# Altium PCB ECG_Final.PcbDoc (part 3 of 3)
Units mil, origin at the board's own origin, x right, y up, seen from the top; angles counter-clockwise.
Board outline 2555.63 x 1380.57 mil, 4 copper layers (Top Layer, Layer 1, Layer 2, Bottom Layer), stack 61.583 mil thick; 110 components, 95 nets, 402 pads, 94 vias.
Unrouted connection lines stored in the file: 82.
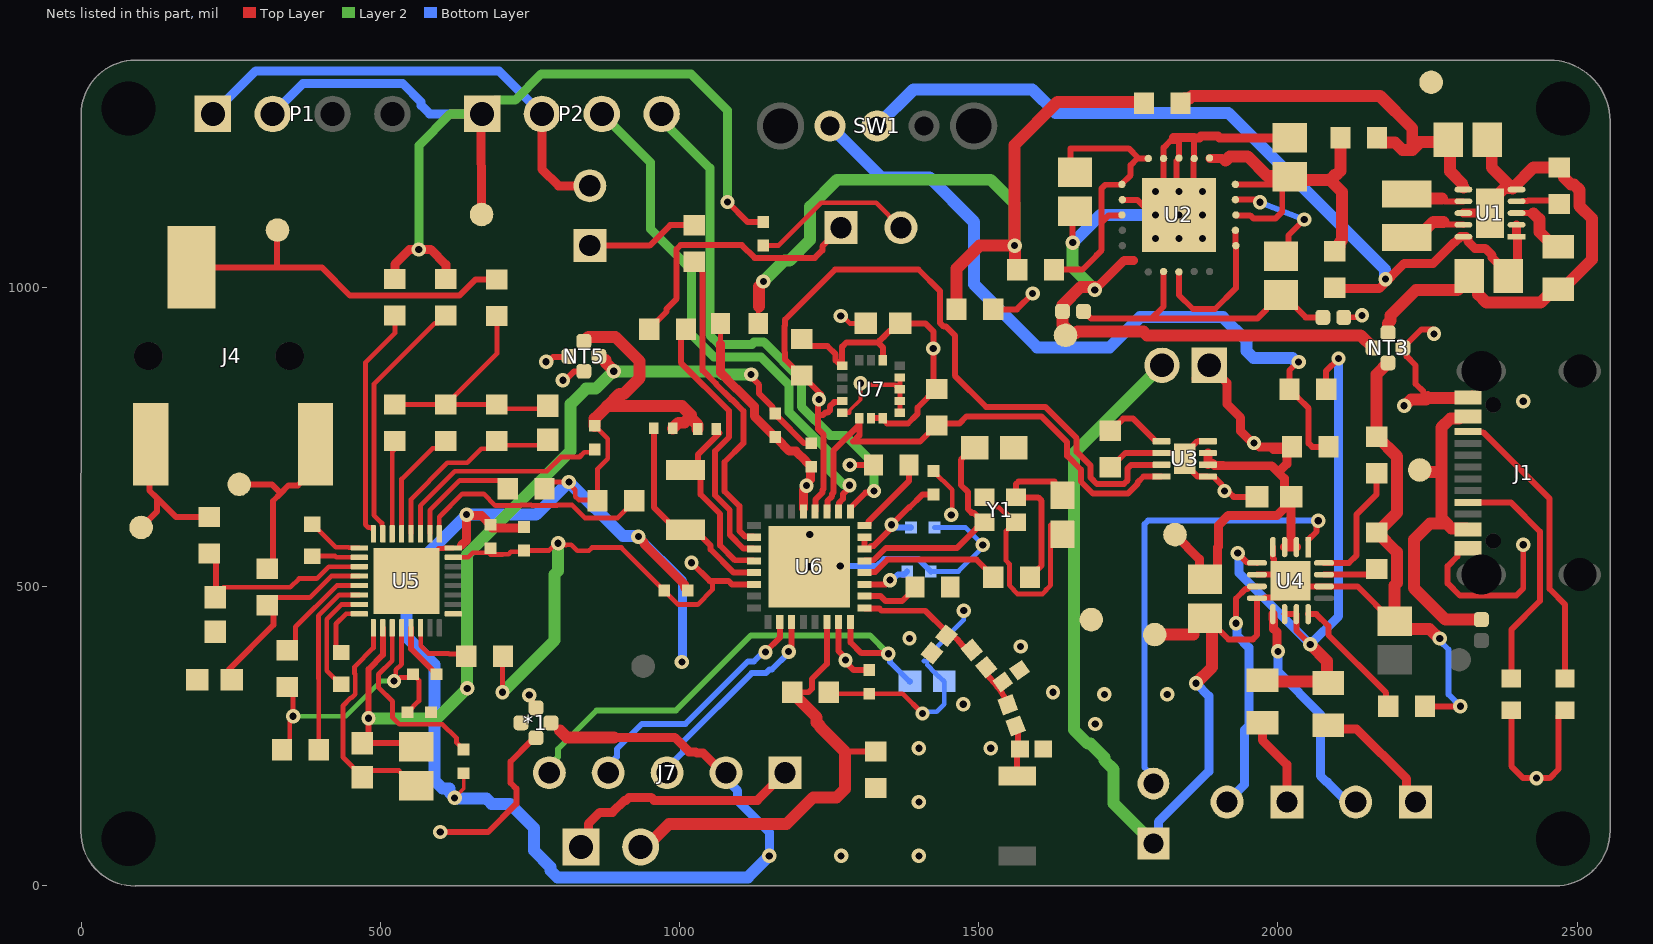
[diagram p4: the nets of this part, all layers, seen from the top]

## Via types
v1: diameter 24, hole 12, Top Layer to Bottom Layer, 84 vias
v2: diameter 23.62, hole 11.81, Top Layer to Bottom Layer, 9 vias
v3: diameter 24/24/24/24 (per signal layer), hole 12, Top Layer to Bottom Layer, 1 vias

## Nets (pads, with @x,y where several pads share a name; then routed paths per layer and width w, separated by ;. In a path a pad name is that pad's centre, name@x,y a point inside that pad or via, vN(x,y) a via of type N, cw(c..) or ccw(c..) an arc to the next point about the centre after c; other vN are vias at no path point) (continued)
AGND: *1.1 C10.2 C11.1 C16.1 C17.1 C20.2 C21.2 C34.2 C35.2 NT5.1 U5.10 U5.13 | length 1640.6
  Top Layer w10: v1(480,280) 480,248.61 C20.2@470,238.61 553.9,238.61 C21.2@560,232.51 ; v1@480.19,280 480.19,362.19 503.96,385.96 U5.10@503.96,431.21 ; U5.13@551.2,431.21 551.2,396.17 C10.2@593.82,353.55 ; v1(1119.61,854.5) 1119.61,850.71 1133,837.32 1133,822.63 1155.16,800.48 1155.16,794.21 1164.84,784.53 1164.84,782.84 1208,739.68 C34.2@1220,739.68
  Top Layer w20: NT5.1@876,879 876,875.08 890,861.08 v1(890,860)
  Layer 2 w20: v1(480,280) 595,280 v1(645,330) ; v1@645,331.08 645,554 818,727 818,805 843.95,830.95 859.87,830.95 888.92,860 v1(890,860) 890.75,859.25 1067.61,859.25 1072.36,854.5 v1(1119.61,854.5)
AVDD: C10.1 C11.2 R37.1 R38.1 U5.12 | length 515.6
  Top Layer w8: R38.1@335.7,227.58 348.6,240.49 348.6,273.69 354.13,279.22 v1(354.13,283.55) 354.13,322.39 R37.1@344.13,332.39 ; U5.12@535.45,431.21 535.45,370.65 525.77,360.98 525.77,345.47 v1(522.71,342.41) 527.04,342.41 532.61,347.98 548.87,347.98 C10.1@554.45,353.55 564.45,343.55 564.45,309.13 C11.2@545.32,290
  Layer 2 w8: v1(354.13,283.55) 442.44,283.55 501.3,342.41 v1(522.71,342.41)
BGND: C6.1 C8.1 J2.2 NT3.1 pad.3@1794,420 R11.1 R14.1 R15.1 R16.1 U4.4 U4.6 U4.8 U4.14 U4.17 | length 2723.9
  Top Layer w10: C8.1@1878,447.49 1881.97,447.49 1917.46,412 1958.14,412 1965,418.86 U4.8@1965,480.63 ; U4.6@1965,520 2001.71,520 1993.05,538.14 1993.05,546.19 1991.5,547.74 U4.4@1991.5,566.18 ; U4.8@1977.05,480.92 1978.31,482.18 2003.95,482.18 2004.05,482.09 2019.04,493.83 U4.17@2019.76,499.7 ; U4.17@2021.03,510.16 2030.87,500.31 U4.14@2077.05,500.31 2133.23,500.31 2191.03,442.51 C6.1@2195,442.51 ; R11.1@2245.58,300 v1(2305,300)
  Top Layer w20: pad.3@1794,420 1858.54,420 1859.33,420.79 1859.33,432.79 1874.03,447.49 C8.1@1878,447.49 1890,435.49 1890,365.29 v1(1863.14,338.43) ; R14.1@2165,590.58 R14.1@2166.05,590.58 ; R15.1@2165,750.58 2165,855 NT3.1@2184.01,874.01 ; R15.1@2166.05,750.58 2199.02,717.61 2199.02,623.55 R14.1@2166.05,590.58 ; v1(2270.47,413.32) 2269.39,413.32 2253.67,429.05 2208.46,429.05 C6.1@2195,442.51 2195,502.07 2198.86,505.93 2198.86,557.77 R14.1@2166.05,590.58
  Layer 2 w20: R16.1@1792,71 1725.42,137.58 1725.42,194.44 1710,209.87 1710,214.44 1686.78,237.65 1682.22,237.65 1659,260.87 1659,722.74 J2.2@1806.26,870
  Bottom Layer w10: v1(2270.47,413.32) 2270.47,409.53 2285,395.01 2285,320 v1(2305,300)
  Bottom Layer w15: R16.1@1792,71 1800.08,79.08 1800.08,106.72 1884.57,191.21 1884.57,317 v1(1863.14,338.43)
BOOT0: J5.2 R30.1 R32.2 U6.22 | length 789.3
  Top Layer w10: R30.1@1188.14,323.53 1215.54,323.53 1221.39,329.39 1221.39,346.04 1246.19,370.84 U6.22@1246.19,440.87 ; 1276.84,223.7 1277.59,224.45 R32.2@1328.23,224.45
  Top Layer w20: J5.2@935,65 944.03,65 982.58,103.55 1179.03,103.55 1223.4,147.91 1262.59,147.91 1276.84,162.16 1276.84,223.7 1234.6,265.93 1234.6,267.49 1229.06,273.03 1229.06,281.56 1188.14,322.48 R30.1@1188.14,323.53
DGND: *1.3 C12.2 C13.1 C18.1 C19.1 C22.2 C23.1 C24.2 C25.1 C26.2 C27.2 C28.2 C29.2 C30.2 C31.2 C32.2 C33.2 C36.1 C37.1 C38.1 C39.1 C40.1 DS3.2 DS4.2 J7.2 NT5.4 P1.1 P2.2 pad.3@1688,445 pad.3@2256,1343 R25.1 R27.1 R30.2 R32.1 U5.24 U5.33 U6.33 U7.5 U7.9 U7.10 U7.11 U7.12 Y1.2 Y1.4 | length 6027.5
  Top Layer w6: v1(624,147) 639,162 C18.1@639,188.31 ; 1283.43,790.63 1284.43,791.63 1284.43,794.63 1302.43,812.63 v1(1302.43,839.84)
  Top Layer w8: U5.33@543.33,509.75 597.3,563.73 606.28,563.73 607.09,564.54 621.54,564.54 U5.24@621.87,564.87 ; R25.1@774.13,663.55 785.58,675 v1(815,675) 815,672.36 825.79,661.57 825.79,650.56 831.44,644.91 861.59,644.91 R27.1@862.94,643.55 ; *1.3@785,272.5 787.41,272.5 800,259.91 ; C19.1@858.06,768.77 880,746.82 880,713.78 862.98,696.76 R27.1@862.98,643.59 ; C29.2@1140,1070.32 1165.4,1070.32 1236.64,1141.56 1328.44,1141.56 DS3.2@1370,1100 ; R30.2@1249.3,323.53 1251.68,321.15 1372.85,321.15 v1(1406,288) ; v1(1269.5,952.43) 1272.21,952.43 1284.64,940 C40.1@1311.39,940 ; U7.5@1271.77,790.63 1283.43,790.63 ; v1(1302.43,839.84) 1304.83,837.45 1361.1,837.45 1361.1,835.16 1366.26,830 U7.11@1368.23,830 U7.10@1368.23,810.32 U7.9@1368.23,790.63 ; U7.11@1365.34,830 1368.23,832.89 U7.12@1368.23,849.68 ; C27.2@1424.13,693.24 1455.78,661.59 1455.78,621.78 v1(1454,620) ; Y1.4@1509.36,649.18 1511.33,649.18 1527.9,632.61 1533.45,632.61 1541.64,624.42 1543.97,624.42 Y1.2@1560.54,607.84 ; Y1.2@1562.51,607.84 Y1.2@1560.54,607.84 ; C38.1@1640,587.45 1624.28,603.18 1620,603.18 1620,502.69 1612.43,495.12 1612.43,493.71 1606.57,487.85 1564.48,487.85 1558.62,493.71 1558.62,495.12 1551.27,502.47 1551.27,537.9 1545.73,543.44 1545.73,593.03 Y1.2@1560.54,607.84
  Top Layer w10: v1(1284.67,703.34) 1323.92,703.34 C32.2@1324.13,703.55
  Top Layer w15: 635.35,569.2 644.13,577.98 v1(644.13,620.37) 645.86,618.65 669.11,618.65 C13.1@686.48,601.28 ; C13.1@686.48,598.43 738.74,598.43 C12.2@740,599.68 ; P2.2@770,1290 770,1197.69 797.69,1170 DS4.2@850,1170 ; 890,248.2 991.81,248.2 1016.09,223.92 1026.7,223.92 1028.89,221.72 1039.5,221.72 1072.22,189 J7.2@1077.57,189 ; v1(931.11,583.65) 931.11,582.81 941.64,572.28 941.64,570.06 1007.98,503.72 1007.98,499.39 C28.2@1013.82,493.55
  Top Layer w20: 800,259.91 811.72,248.2 890,248.2 ; NT5.4@840,910 847.5,917.5 892.5,917.5 933.26,876.74 933.26,848.66 906.6,822 899.28,822 878.92,801.64 ; C19.1@858.06,768.77 858.06,780.77 878.92,801.64 ; C36.1@988.57,764.68 997.82,773.94 1007.82,773.94 1018.74,784.86 1018.74,786.87 1003.97,801.64 878.92,801.64 ; 1019.05,781.23 1030.06,770.22 C37.1@1030.06,763.55
  Bottom Layer w8: v1(1406,288) 1409.06,291.06 1429.68,291.06 1442.37,303.75 C25.1@1442.37,341.59 1427.5,355.54 1413.83,369.21 ; 1408.68,375.89 ccw(c1411.38,380.97) 1416.36,378.1 1417.13,379.43 1417.13,386.54 1475,444.42 v1(1475,460) ; C31.2@1419.75,525.42 1466.01,525.42 1503.39,562.81 1503.39,564.3 v1@1502.33,565.36 ; C33.2@1426.22,598.75 1477.9,598.75 1502.33,574.32 v1@1502.33,565.36 ; v1(1506.81,569.84) v1@1502.33,565.36
  Bottom Layer w10: U6.33@1268.65,534.39 1329.74,534.39 1341.61,546.27 1398.91,546.27 C31.2@1419.75,525.42
  Bottom Layer w15: P1.1@220,1290 292,1362 698,1362 P2.2@770,1290 ; v1(931.11,583.65) 1005.25,509.52 1005.25,375.47 v1(1003.78,374) ; J7.2@1077.57,189 1077.57,178.14 1097.13,158.59 1097.13,142.15 1150,89.28 v1(1150,50)
  Bottom Layer w20: v1(931.11,583.65) 930.35,584.42 905.58,584.42 v1(815,675) 760.37,620.37 v1(644.13,620.37) 543.33,519.56 543.33,416.67 590,370 590,176.54 604.14,162.4 615.52,162.4 615.52,156.56 624,148.08 v1(624,147) 625,146 677,146 686,137 716.25,137 756.86,96.39 756.86,58.7 784.09,31.47 784.09,25.81 795.81,14.09 1114.09,14.09 v1(1150,50)
  other v1: 1270,50 1400,50 1400,140 1400,230 1520,230 1694.62,270.5 1474.13,303.55 1710,320 1815,320 1624.13,323.55 1570,400 1384.13,413.55
DGNG: C5.1 NT2.1 NT4.1 U2.7 | length 526.3
  Top Layer w10: NT2.1@1675,960 1675.68,960 1687.71,947.97 1788.57,947.97 ; U2.7@1808.9,1026.69 1808.9,968.3 1788.57,947.97 ; NT4.1@2075,950 2046.46,950 2008.97,987.49 C5.1@2005,987.49 2001.03,987.49 1981.33,967.79 1981.33,963.82 1965.48,947.97 1788.57,947.97
DVDD: C12.1 C13.2 C26.1 C27.1 C28.1 C29.1 C31.1 C33.1 C40.2 J5.1 J7.1 P1.2 P2.1 pad.3@669,1122 R22.1 R26.2 R28.2 R33.1 R34.1 R35.1 U5.23 U6.14 U6.23 U6.27 U6.30 U6.31 U7.1 U7.7 U7.8 U7.14 | length 4152.3
  Top Layer w8: U5.23@621.87,549.12 646.57,549.12 654.27,556.82 683.15,556.82 C13.2@684.13,557.8 ; 684.13,553.87 703.84,553.87 ; 703.84,554.29 714.16,554.29 718.16,558.29 737.97,558.29 C12.1@740,560.32 781.52,560.32 793.7,572.5 v1(796.91,572.5) 799.97,569.43 809.61,569.43 809.94,569.11 810.83,570 818.86,570 828.86,560 848.39,560 853.67,565.28 902.72,565.28 C28.1@974.45,493.55 998,470 1030.12,470 1054.82,494.7 1054.82,505.18 1050.39,509.61 ; v1(704.13,323.55) 704.13,382.97 R22.1@704.71,383.55
  Top Layer w10: v1(1020,540) 1050.39,509.61 1081.75,509.61 1087.49,503.87 U6.14@1124.13,503.87 ; v1(1080,1143) 1113.32,1109.68 C29.1@1140,1109.68 ; R34.1@1204.13,914.13 1216.04,902.23 1246.95,902.23 1260.84,888.33 1260.84,878.33 1269.8,869.37 U7.1@1271.77,869.37 1271.77,901.26 1278.6,908.09 1331.45,908.09 ; U6.23@1265.88,440.87 1265.88,392.25 1277.17,380.96 v1(1277.17,377.17) ; v1@1280,380 1282.68,377.32 1282.68,368.88 1291.04,360.52 C26.1@1316.87,360.52 ; U6.27@1309.17,503.87 1344.6,503.87 v1(1351.73,511) ; U6.30@1309.17,562.92 1310.08,563.83 1315.99,563.83 1320.36,568.2 1324.51,568.2 1351.46,595.15 1351.46,600.87 v1(1354.13,603.55) 1384.15,633.57 1384.15,632.23 1405.79,653.87 C27.1@1424.13,653.87 ; U6.30@1309.17,563.16 U6.31@1309.17,582.61 ; U7.7@1320,781.77 U7.8@1339.68,781.77 1339.68,779.8 1346.75,772.74 1381.64,772.74 1395.26,786.36 1397.62,788.72 1397.62,799.25 R35.1@1428.95,830.58 ; 1337.89,901.64 1331.45,908.09 ; U7.14@1339.68,878.23 1339.68,899.52 ; C40.2@1355.77,932.41 1355.77,928.08 1354.74,927.04 1350.4,927.04 1341.26,917.9 1341.26,917.49 1334.82,911.04 1334.4,911.04 1331.45,908.09 ; C40.2@1368.61,940 1410.59,940 1424,926.59 1424,835.53 R35.1@1428.95,830.58 ; R35.1@1430,830.58 R35.1@1428.95,830.58 ; R33.1@1524.13,963.55 1563.55,963.55 v1(1590,990)
  Top Layer w15: R26.2@524.13,1014.37 524.13,1038.8 548.47,1063.14 563.72,1063.14 v1(564.13,1063.55) 584.13,1063.55 609.42,1038.27 R28.2@609.42,1014.37 ; pad.3@669,1122 668,1288 P2.1@670,1290 ; J5.1@835,65 847.42,77.42 847.42,103.55 866.59,122.72 887.86,122.72 908.13,143 910.78,143 915.74,147.96 952.53,147.96 957.49,143 1130,143 J7.1@1176,189
  Layer 2 w15: v1(564.13,1063.55) 564.13,1237.15 616.99,1290 P2.1@670,1290 693.01,1313.01 725.11,1313.01 769.1,1357 1019,1357 1080,1296 v1(1080,1143)
  Layer 2 w20: v1(704.13,323.55) 791.05,410.46 791.05,520.49 796.91,526.36 v1(796.91,572.5)
  Bottom Layer w10: v1(1351.73,511) 1355.52,511 1365.1,520.58 1375.54,520.58 C31.1@1380.38,525.42 ; v1(1354.13,603.55) 1357.92,603.55 1362.72,598.75 C33.1@1386.85,598.75
  Bottom Layer w15: P1.2@320,1290 371,1341 536.9,1341 568.01,1309.89 568.01,1304.23 582.24,1290 P2.1@670,1290
  other v1: 1424,898
GBUCK: C1.1 C2.1 NT3.3 R5.1 R6.1 U1.5 U1.8 U1.11 | length 935.2
  Top Layer w15: U1.8@2310,1124.37 U1.11@2354.41,1124.37 ; U1.11@2375.84,1163.51 U1.5@2394.03,1163.51
  Top Layer w20: NT3.3@2184.01,924.01 2184.01,940.04 2188.5,944.53 2188.5,953.5 2230.67,995.67 2300.28,995.67 2319.98,1015.36 C1.1@2319.98,1019.33 2334.68,1004.64 2334.68,988.55 2348.56,974.67 2438.83,974.67 2461.52,997.36 2475.3,997.36 2525.06,1047.12 2525.06,1114.94 2503.96,1136.04 2503.96,1162.95 2494.58,1172.32 2489.67,1172.32 2477.96,1184.04 2477.96,1193.68 R6.1@2471.05,1200.58 ; C2.1@2350,1247.12 2357.38,1239.74 2357.38,1200.17 U1.5@2391.89,1165.66 ; U1.11@2354.41,1124.37 2354.41,1142.09 U1.11@2375.84,1163.51 ; U1.5@2394.03,1167.8 2426.81,1200.58 R6.1@2471.05,1200.58 ; R6.1@2470,1200.58 R6.1@2471.05,1200.58
GND: *1.2 *1.4 C7.1 J1.A1-B12 J1.B1-A12 NT3.4 NT4.2 NT5.2 NT5.3 R3.1 R7.1 R13.2 U3.1 U3.4 U3.6 U3.9 | length 1619
  Top Layer w10: v1(600,90) 680,90 727.13,137.13 727.13,162.33 717.44,172.03 717.44,207.44 *1.4@751.5,241.5 ; v1@744.96,318.74 v1(748.75,318.74) 748.75,314.95 753.27,310.43 753.27,306.73 *1.2@756.5,303.5 ; v1(777,876) 780.79,876 788.33,883.54 807.6,883.54 809.05,885 NT5.3@815,885 ; v1(805,845) 808.79,845 823.79,860 NT5.2@840,860 ; R13.2@1720,699.42 1721.05,699.42 1745.03,723.39 U3.6@1805.36,723.39 1834.29,723.39 U3.9@1844.13,713.55 ; 1865.47,742.76 1844.13,721.43 U3.9@1844.13,713.55 ; 1866.92,743.08 U3.4@1882.91,743.08 ; C7.1@1965,650 1925.86,650 1920,655.86 1920,656.58 1892.88,683.71 1883.23,683.71 1882.6,684.34 1865.47,684.34 1844.13,705.68 U3.9@1844.13,713.55 ; NT4.2@2110,950 2110.28,950.28 2137.35,950.28 v1(2140.42,953.35) ; NT3.4@2209.01,899.01 2240,930 2260,930 2260,923.37 v1(2260.92,922.45) ; v1(2210.92,802.45) v1@2211.65,801.72 ; 2215.01,885.44 2215.01,884.99 2230,870 2230,839.03 2243.45,825.58 2243.45,823.08 2247.89,818.64 ; 2251.02,821.77 2257.28,815.51 ; J1.A1-B12@2317.36,564.09 2306.54,564.09 2299.72,557.28 2299.72,550.43 2283.66,534.37 2283.66,505.63 2303.98,485.31 2398.31,485.31 2410,497 v1(2410,570) ; J1.B1-A12@2317.36,816.06 J1.B1-A12@2324.17,822.87 ; R3.1@2390,293.41 2390,200 2410,180 2454.14,180 2469.01,194.87 2469.01,283.54 2478.89,293.41 R7.1@2480,293.41 ; v1@2407.12,810 v1(2410,810)
  Top Layer w20: v1@2211.65,801.72 2211.65,802.1 2222.7,813.15 2247.26,813.15 2249.62,815.51 2316.81,815.51 J1.B1-A12@2317.36,816.06
  other v1: 2432.07,180 1910.82,659.86
IN1N: J4.1 pad.3@100,599 R23.1 | length 256.1
  Top Layer w10: pad.3@100,599 126.83,625.83 126.83,647.83 ; J4.1@115.96,737.91 114.13,736.09 114.13,660.52 126.83,647.83 ; R23.1@213.94,616.66 158,616.66 126.83,647.83
IN1P: J4.3 pad.3@264,671 R24.1 | length 326
  Top Layer w10: pad.3@264,671 318.43,671 333.31,656.12 ; R24.1@310.96,530.06 320.41,539.51 320.41,643.23 333.31,656.12 ; J4.3@391.55,737.91 391.55,698.54 362.02,669.02 346.2,669.02 333.31,656.12
NetA1_1: 
NetC1_2: C1.2 R4.2 SW1.2 U1.1 U1.2 U1.10 | length 1473.1
  Top Layer w15: R4.2@2095,999.42 2096.45,997.97 2168.96,997.97 2211.14,1040.16 2259.59,1040.16 2295.04,1075.6 2295.95,1075.6 2305.34,1085 U1.10@2314.56,1085 ; U1.10@2310,1085 U1.10@2314.56,1085 ; U1.2@2398.82,1104.69 U1.1@2398.82,1085 2400.23,1083.6 2400.23,1034.56 C1.2@2385,1019.33 2385,1023.3 2358.18,1050.13 2358.18,1053.59 2346.25,1065.51 2329.21,1065.51 2317.29,1077.44 2317.29,1082.27 U1.10@2314.56,1085
  Bottom Layer w20: SW1.2@1330,1270 1391,1331 1589.4,1331 1628.4,1292 1917,1292 2179.08,1029.92 2179.08,1014.83 v3(2179.85,1014.07)
NetC2_2: C2.2 R1.1 R2.1 U1.6 | length 679
  Top Layer w20: R1.1@1837.38,1307.96 1837.38,1309.01 1844.28,1315.91 1851.91,1315.91 1856,1320 2170.6,1320 2224.47,1266.12 2224.47,1230.53 2225,1230 ; R2.1@2165.58,1250 2165.58,1248.95 2172.48,1242.04 2195.98,1242.04 2208.55,1229.47 2224.47,1229.47 2225,1230 ; C2.2@2284.98,1247.12 2284.98,1245.49 C2.2@2287.51,1242.96 ; U1.6@2310,1166.78 2308.08,1168.7 2308.08,1173.48 2287.51,1194.04 C2.2@2287.51,1242.96 ; 2225,1230 2231.49,1237.07 2236.9,1242.96 C2.2@2287.51,1242.96
NetC4_2: C4.2 R8.1 U2.1 U2.3 U2.20 | length 508.1
  Top Layer w10: R8.1@1625.58,1030 1673.53,1030 1697,1053.47 1697,1054 1705.32,1062.32 1705.32,1108.69 1705.42,1108.8 ; C4.2@1661,1192.51 1653.55,1199.97 1653.55,1232.51 1750.56,1232.51 1766.94,1216.13 ; U2.3@1739.29,1121.18 1738.83,1120.72 1737.13,1120.72 1736.94,1120.53 1717.15,1120.53 1705.42,1108.8 ; U2.20@1783.31,1215.67 1766.94,1215.67 1765.17,1215.67 1753.89,1204.39 1753.89,1187.61 1739.29,1173.01 U2.1@1739.29,1172.36 1738.83,1171.9 1737.13,1171.9 1736.94,1171.71 1711.28,1171.71 1705.32,1165.75 1705.32,1133.67 1705.42,1133.57 1705.42,1108.8
NetC5_2: C5.2 U2.14 | length 199.6
  Top Layer w10: U2.14@1928.98,1146.77 1962.06,1146.77 1966.21,1142.62 v1(1970,1142.62) ; C5.2@2005,1052.51 2017.51,1065.02 2017.51,1086.93 v1(2044.13,1113.55)
  Bottom Layer w10: v1(1970,1142.62) v1(2044.13,1113.55)
NetC9_1: C9.1 R18.1 R19.1 R20.2 R21.1 | length 440.8
  Top Layer w8: R21.1@523.84,804.61 R19.1@609.12,804.61 R18.1@694.4,804.61 ; R19.1@610.17,804.61 694.7,889.13 R20.2@694.7,952.39 ; R18.1@694.4,797.34 774.38,797.34 C9.1@779.68,802.64
NetC16_2: C16.2 R23.2 U5.3 | length 356.1
  Top Layer w8: C16.2@237.91,498.87 349.45,498.87 364.13,513.55 393.7,513.55 413.52,533.37 U5.3@464.78,533.37
  Top Layer w10: C16.2@224.13,482.16 224.13,483.26 236.91,496.04 C16.2@236.91,494.02 ; C16.2@225.14,482.25 R23.2@225.14,544.3 ; R23.2@225.14,544.3 R23.2@213.94,555.5 R23.2@225.14,544.3
NetC17_2: C17.2 R24.2 U5.4 | length 337.8
  Top Layer w8: R24.2@310.96,468.9 314.94,472.88 319,472.88 319,475.88 324.92,481.8 382.04,481.8 417.86,517.62 U5.4@464.78,517.62
  Top Layer w10: C17.2@251.37,344.65 246.59,349.43 246.59,361.38 321.18,435.97 321.18,470.7 R24.2@319,472.88
NetC18_2: C18.2 U5.11 | length 314.9
  Top Layer w8: U5.11@519.7,431.21 519.7,376.17 496.71,353.18 496.71,331.64 520.28,308.08 520.28,281.21 531.33,270.16 603.67,270.16 626.41,247.41 627.27,247.41 627.27,239.41 C18.2@639,227.69
NetC19_2: C19.2 U5.27 | length 377.1
  Top Layer w8: U5.27@566.95,588.29 566.95,635.33 624.62,692.99 778.23,692.99 801.94,716.7 832.74,716.7 840.71,724.68 853.33,724.68 C19.2@858.06,729.4
NetC23_2: C23.2 E1.1 L2.1 | length 88.9
  Top Layer w10: L2.1@1561.44,267.3 1561.32,267.3 1560.95,266.93 cw(c1547.91,257.27) 1564.13,257.27 1565.43,255.97 1565.43,232.45 C23.2@1569.13,228.75 1569.13,224.58 1564.13,219.58 E1.1@1564.13,183.55
NetC24_1: C24.1 L2.2 L3.1 | length 116.4
  Top Layer w10: L3.1@1512.59,365.24 1514.55,352.74 1530.73,333.46 1531.4,332.5 1539.59,340.68 C24.1@1540.04,340.68 ; C24.1@1531.46,332.1 1535.17,328.4 1535.29,328.4 1542.1,316.61 ; 1542.37,316.11 L2.2@1542.72,315.51 ; L2.2@1542.72,315.51 L2.2@1548.56,309.67 ; L2.2@1542.72,315.51 L2.2@1548.56,309.67 ; L2.2@1542.72,315.51 L2.2@1548.56,309.67 ; L2.2@1548.56,302.7 L2.2@1548.56,309.67 ; L2.2@1548.56,302.7 L2.2@1548.56,309.67 ; L2.2@1548.56,302.7 L2.2@1548.56,309.67
NetC30_1: C30.1 U6.26 | length 98.5
  Top Layer w10: U6.26@1309.17,484.18 1335.91,484.18 1344.34,475.76 1371.67,475.76 1393.27,497.36 C30.1@1393.27,499.33
NetC32_1: C32.1 U6.32 | length 135.4
  Top Layer w10: U6.32@1309.17,602.29 1315.08,602.29 1315.99,603.2 1315.99,609.1 1383.19,676.31 C32.1@1383.19,703.55
NetC38_2: C38.2 R36.1 Y1.3 | length 298.5
  Top Layer w10: R36.1@1585.53,515.81 1585.53,516.86 1597.43,528.76 1598.48,528.76 1605,535.28 1605,643.32 1599.14,649.18 Y1.3@1562.51,649.18 1562.51,671.88 1566.46,675.84 1626.71,675.84 1626.71,665.84 C38.2@1640,652.55
NetDS1_1: DS1.1 R10.1 | length 205.8
  Top Layer w15: R10.1@2091.02,268.12 2097.12,262.03 2131.53,262.03 2215,178.56 2215,155 DS1.1@2230,140
NetDS1_2: DS1.2 U4.9 | length 380.3
  Top Layer w15: U4.9@1991.5,454.13 1991.5,446.06 1992.97,444.58 1992.97,429.58 1998.46,424.1 1998.46,393.54 v1(2000.18,391.82)
  Bottom Layer w15: v1(2000.18,391.82) 2000.18,357.5 2070.97,286.72 2070.97,184.03 2081.8,173.2 2082.63,173.2 2115.84,140 DS1.2@2130,140
NetDS2_1: DS2.1 R12.1 | length 149.6
  Top Layer w15: R12.1@1974.13,272.69 1974.13,243.56 2015,202.69 DS2.1@2015,140
NetDS2_2: DS2.2 U4.7 | length 407.6
  Top Layer w10: v1(1930,439) 1930,480.18 1946.16,496.34 1949.27,496.34 1953.24,500.31 U4.7@1965,500.31
  Bottom Layer w15: DS2.2@1915,140 1944,169 1944,260.07 1951.51,267.58 1951.51,398 1931.72,417.79 1931.72,437.28 v1(1930,439)
NetDS3_1: DS3.1 R29.1 | length 464.6
  Top Layer w10: R29.1@949.42,930 949.42,931.05 978.26,959.89 978.26,964.31 995.18,981.23 995.18,1064.43 1001.62,1070.88 1104.2,1070.88 1125.6,1049.47 1226.14,1049.47 1238.7,1062.04 1238.7,1068.7 DS3.1@1270,1100
NetDS4_1: DS4.1 R39.1 | length 188.3
  Top Layer w10: DS4.1@850,1070 950,1070 984.13,1104.13 R39.1@1024.13,1104.13
NetJ1_A5: J1.A5 R3.2 | length 406.2
  Top Layer w10: J1.A5@2317.36,640.87 2389.13,640.87 2438,592 2438,476.23 2390,428.23 R3.2@2390,346.59
NetJ1_B5: J1.B5 R7.2 | length 494.2
  Top Layer w10: J1.B5@2317.36,758.98 2318.27,758.07 2342.93,758.07 2454,647 2454,496 2480,470 R7.2@2480,346.59
NetL1_1: L1.1 U1.7 | length 100.1
  Top Layer w10: 2273.9,1149.02 2278.86,1144.06 U1.7@2310,1144.06
  Top Layer w20: L1.1@2215,1156.44 2222.43,1149.02 2273.9,1149.02
NetL1_2: L1.2 U1.9 | length 107.9
  Top Layer w10: 2276.51,1109.65 2281.25,1104.91 2309.77,1104.91 U1.9@2310,1104.69
  Top Layer w20: L1.2@2215,1083.56 2233.73,1083.56 2259.82,1109.65 2276.51,1109.65
NetR5_2: R5.2 U1.3 | length 105.3
  Top Layer w10: U1.3@2398.82,1124.37 2426.57,1124.37 2426.93,1124.02
  Top Layer w20: 2426.93,1124.02 2436.82,1114.12 2436.82,1092.92 2461.52,1068.23 R5.2@2468.41,1068.23
NetR6_2: R6.2 U1.4 | length 63.9
  Top Layer w10: U1.4@2408.71,1144.28 2417.49,1144.28 2418.23,1145.02 2464.4,1145.02 R6.2@2470,1139.42
NetR9_1: R9.1 R10.2 R12.2 U4.5 U4.10 U4.11 | length 1059.4
  Top Layer w10: v1(1933,556) 1949.03,539.97 1964.71,539.97 U4.5@1965,539.68 ; U4.10@2011.18,454.13 U4.11@2030.87,454.13 2030.87,426.82 2050.35,407.34 v1@2054.13,407.34 ; R9.1@2080.58,830 2080.58,860.58 v1(2101.34,881.34)
  Top Layer w20: R12.2@1974.13,343.55 1976.42,341.27 2081.85,341.27 2081.85,375.84 v1(2054.13,403.55)
  Bottom Layer w15: v1(1933,556) 1934.72,554.28 1934.72,522.96 v1(2054.13,403.55) 2101.34,450.76 v1(2101.34,881.34)
NetR11_2: R11.2 U4.12 | length 217.7
  Top Layer w10: U4.12@2050.55,454.13 2064.34,454.13 2084.44,434.04 2084.44,418.99 2180.93,322.5 2180.93,303.49 R11.2@2184.42,300
NetR13_1: R13.1 U3.5 | length 109.4
  Top Layer w10: R13.1@1720,760.58 1721.05,760.58 1741.31,780.83 1757.96,780.83 1795.71,743.08 U3.5@1805.36,743.08
NetR14_2: R14.2 U4.15 | length 91.9
  Top Layer w10: U4.15@2077.05,520 2155.58,520 R14.2@2165,529.42
NetR15_2: R15.2 U4.16 | length 210.6
  Top Layer w10: U4.16@2077.05,539.68 2118.84,539.68 2131.49,552.33 2131.49,620.9 2165,654.42 R15.2@2165,689.42
NetR16_2: R16.2 U4.1 | length 771.4
  Top Layer w10: U4.1@2050.84,578.23 2064.73,592.12 2064.73,607.6 v1(2067.41,610.28)
  Bottom Layer w10: R16.2@1792,171 1792,182.68 1777,197.68 1777,604.42 1782.86,610.28 v1(2067.41,610.28)
NetR22_2: R22.2 U5.14 | length 113.7
  Top Layer w8: U5.14@566.95,431.21 567.28,430.88 567.28,401.31 580.21,388.37 614.3,388.37 615.15,387.52 639.58,387.52 R22.2@643.56,383.55
NetR25_2: R25.2 U5.26 | length 196.7
  Top Layer w8: U5.26@582.7,588.29 582.7,627.7 632.51,677.51 700.07,677.51 712.98,664.6 R25.2@712.98,663.55
NetR27_2: R27.2 U5.25 | length 400.4
  Top Layer w8: U5.25@598.44,588.29 598.44,616.44 637,655 672.53,655 691.93,635.6 734.02,635.6 734.98,636.55 752.13,636.55 753.09,635.6 795.18,635.6 796.14,636.55 820,636.55 841.55,615 896.6,615 924.1,642.5 R27.2@924.1,643.55
NetR29_2: R29.2 U6.11 | length 450.2
  Top Layer w10: R29.2@1010.58,930 1002.11,921.53 1002.11,874.44 1082.56,794 1082.56,749.96 1059.13,726.53 1059.13,652.79 1083.82,628.1 1083.82,586.7 1106.7,563.83 1123.23,563.83 U6.11@1124.13,562.92
NetR37_2: R37.2 U5.5 | length 181
  Top Layer w8: R37.2@344.13,393.55 345.19,393.55 358.09,406.46 358.09,432.89 427.08,501.88 U5.5@464.78,501.88
NetR38_2: R38.2 U5.6 | length 306.8
  Top Layer w8: R38.2@396.86,227.58 396.86,346.2 396.36,346.7 396.36,451.36 431.13,486.13 U5.6@464.78,486.13
NetR39_2: R39.2 U6.10 | length 536.6
  Top Layer w10: R39.2@1024.13,1042.61 1025.54,1042.61 1037.09,1031.07 1037.09,1026.6 1038.48,1025.21 1038.48,962.1 1038.48,861.52 1060.45,839.55 1060.45,838.73 1086.23,812.95 1087.05,812.95 1106.43,793.57 1106.43,739.7 1075.13,708.39 1075.13,659.42 1099.82,634.72 1099.82,593.33 1109.64,583.51 1123.23,583.51 U6.10@1124.13,582.61
NetU2_8: U2.8 U2.11 U2.12 | length 255
  Top Layer w10: U2.8@1834.49,1025.98 1834.49,987.49 1858.01,963.97 1894.92,963.97 1929.69,998.73 U2.11@1929.69,1070 1929.33,1070.36 1929.33,1095.24 U2.12@1928.98,1095.59
NRST: C25.2 J7.5 U6.24 | length 856.3
  Top Layer w10: U6.24@1285.57,440.87 1285.57,406.96 1303.66,388.86 1348.14,388.86 v1(1349,388)
  Layer 2 w10: J7.5@782.3,189 782.3,201.21 796.78,215.69 796.78,228.78 861.11,293.11 993.79,293.11 1119.08,418.39 1318.61,418.39 v1(1349,388)
  Bottom Layer w10: v1(1349,388) 1351.68,385.32 1351.68,374.14 1384.23,341.59 C25.2@1385.15,341.59
OSC_IN: C39.2 U6.29 Y1.1 | length 380.3
  Top Layer w10: U6.29@1309.17,543.24 1310.08,544.14 1324.07,544.14 1344.92,565 1463.79,565 1495.63,596.84 1496.39,596.84 Y1.1@1507.39,607.84 ; C39.2@1493.17,732.25 1490.28,732.25 1470,711.97 1470,670 1481.63,658.37 1481.63,629.86 1488.07,623.42 1491.82,623.42 Y1.1@1507.39,607.84 ; Y1.1@1509.36,607.84 Y1.1@1507.39,607.84
OSC_IN_32: C36.2 U6.13 XTAL1.1 | length 343.8
  Top Layer w10: C36.2@957.07,764.68 957.07,632.43 994.5,595 XTAL1.1@1005.58,595 ; XTAL1.1@1010,595 1025.5,595 1051.82,568.68 1051.82,562.16 1090.43,523.55 U6.13@1124.13,523.55
OSC_OUT: R36.2 U6.28 | length 236.8
  Top Layer w10: U6.28@1309.17,523.55 1310.08,524.46 1327.01,524.46 1347.55,545 1496.23,545 1524.37,516.86 R36.2@1524.37,515.81
OSC_OUT_32: C37.2 U6.12 XTAL1.2 | length 311.9
  Top Layer w10: XTAL1.2@1010,695 1025.09,695 1035,685.09 1035,654.29 1067.82,621.47 1067.82,568.79 1092.47,544.14 1123.23,544.14 U6.12@1124.13,543.24 ; XTAL1.2@1022.1,697.99 1031.12,707 1031.12,721.14 1066.56,756.58 1061.56,761.58 C37.2@1061.56,763.55
PA3: U5.17
PAG1N: C14.1 U5.1 | length 94.8
  Top Layer w8: C14.1@386.23,604.2 387.21,604.2 425.72,565.7 446.76,565.7 447.5,564.96 464.69,564.96 U5.1@464.78,564.87
PAG1P: C14.2 U5.2 | length 79.4
  Top Layer w8: C14.2@386.23,551.06 424.14,551.06 426.08,549.12 U5.2@464.78,549.12
PAG2N: C15.1 U5.7 | length 183.7
  Top Layer w8: C15.1@434.13,336.98 433.15,336.98 410.36,359.77 410.36,445.56 435.18,470.38 U5.7@464.78,470.38
PAG2P: C15.2 U5.8 | length 97.1
  Top Layer w8: C15.2@434.13,390.13 425.75,398.52 425.75,437.66 442.72,454.63 U5.8@464.78,454.63
"Power Ground": C3.1 C4.1 NT2.2 NT3.2 pad.3@1645,920 U2.2 U2.17 U2.18 U2.19 U2.21 | length 1618.5
  Top Layer w10: v1(1657,1075) 1657,1123.49 C4.1@1661,1127.49 ; U2.2@1740,1146.77 1740,1146.71 1740.75,1145.95 1765.5,1145.95 1790.28,1121.18 v2(1795.12,1121.18) ; v2(1795.12,1160.55) 1808.9,1178.19 U2.19@1808.9,1215.67 1808.9,1233.74 1819.97,1244.82 ; 1825.51,1250.35 1819.97,1244.82 ; v2(1834.49,1160.55) 1830.59,1164.45 1830.59,1211.83 1834.49,1215.73 1834.49,1244.49 1834.82,1244.82 ; 1834.49,1244.82 1819.97,1244.82 ; U2.21@1859.24,1160.55 1859.24,1214.18 U2.17@1860.08,1215.02 ; U2.17@1860.08,1215.67 1860.08,1245.55 ; v2(1873.86,1081.81) v2(1873.86,1121.18) ; 1910.74,1250.35 1911.1,1250
  Top Layer w15: v1(1694,996) 1743.46,1045.46 1758.77,1045.46 ; 1825.51,1250.35 1860.08,1250.35 ; 1860.08,1250 1868.68,1250 1871.53,1252.85 1899.81,1252.85 1902.66,1250 1911.1,1250 C3.1@2020,1250
  Top Layer w20: v1@1694,1001.02 1670.46,1001.02 1640,970.55 NT2.2@1640,960 1640,937.38 1653.67,923.71 1662.4,923.71 1664.89,926.19 1775,926.19 1781.19,920 2138.02,920 NT3.2@2159.01,899.01
  Layer 2 w20: v1(1657,1075) 1657,1033 v1(1694,996)
  Bottom Layer w20: v1(1657,1075) 1703.18,1121.18 v2(1795.12,1121.18)
  other v2: 1795.12,1081.81 1834.49,1081.81 1834.49,1121.18 1873.86,1160.55
RESP_MODN: R26.1 U5.32 | length 393.2
  Top Layer w8: U5.32@488.21,588.29 488.21,594.48 483.83,598.86 479.69,598.86 475,603.55 475,874.42 524.13,923.55 R26.1@524.13,953.21
RESP_MODP: R28.1 U5.31 | length 424.1
  Top Layer w8: U5.31@503.96,588.29 503.96,598.53 503.63,598.86 503.63,601.23 502.54,602.32 502.54,606.37 489.2,619.71 489.2,838.62 590.89,940.3 596.51,940.3 R28.1@609.42,953.21
RF: C22.1 L3.2 U6.25 | length 209.9
  Top Layer w10: U6.25@1309.17,464.5 1310.08,463.59 1333.88,463.59 1337.71,459.76 1410.81,459.76 1444.64,425.92 cw(c1334.42,282.8) 1444.71,425.87 cw(c1440.56,420.55) 1444.9,425.72 C22.1@1449.5,421.86 ; C22.1@1446.25,417.99 1449.5,417.99 1457.01,418 1457.8,418 1463.65,412.14 1476.91,396.34 L3.2@1488.37,394.1
RL: J4.2 pad.3@328,1096 R20.1 | length 604.1
  Top Layer w10: J4.2@184.13,1033.55 327,1033.55 ; pad.3@328,1096 327,1095 327,1033.55 ; R20.1@694.7,1013.55 659.01,1013.55 631.93,986.46 449.08,986.46 401.99,1033.55 327,1033.55
RLDINV: C9.2 R18.2 U5.28 | length 327.5
  Top Layer w8: U5.28@551.2,588.29 551.2,646.2 611.99,706.99 645.2,706.99 668.75,730.55 688.76,730.55 694.4,736.18 770.44,736.18 C9.2@779.68,745.42
RLDOUT: R21.2 U5.30 | length 142.7
  Top Layer w8: U5.30@519.7,588.29 519.7,725.18 R21.2@523.84,729.31
RLDREF: R19.2 U5.29 | length 193.5
  Top Layer w8: U5.29@535.45,588.29 535.45,679.81 587.12,731.48 600.44,731.48 R19.2@611.49,742.53
RXD: P2.4 U6.1 | length 898.3
  Top Layer w10: U6.1@1285.57,625.91 1285.57,631.82 1311.07,657.32 1322.32,657.32 v1(1325,660)
  Layer 2 w15: P2.4@970,1290 970,1279.89 1050.5,1199.39 1050.5,920.5 1066,905 1120.75,905 1124.75,909 1140.53,909 1203.5,846.03 1203.5,800.78 1251.53,752.75 1276.97,752.75 1325,704.73 v1(1325,660)
SCL1: R34.2 U3.7 U6.4 U7.4 | length 1347.7
  Top Layer w10: U6.4@1226.5,625.91 1227.4,626.82 1227.4,646.04 1239.13,657.76 1239.13,661.75 1240.84,663.47 1240.84,754.08 1231.13,763.79 1231.13,783.87 ; U7.4@1271.77,810.32 1269.98,808.52 1258.36,808.52 1251.12,801.28 1251.12,794.54 1247.49,790.92 1243.54,790.92 1239.92,787.3 1234.57,787.3 1231.13,783.87 ; U3.7@1805.36,703.71 1754.81,703.71 1748.96,697.85 1748.96,677.96 1742.51,671.52 1697.49,671.52 1686.92,682.08 1686.92,702.08 1663.72,725.29 1663.72,748.03 1611.2,800.54 1512.21,800.54 1460,852.75 1460,920 1445.4,934.6 1441.52,934.6 1435.07,941.04 1435.07,994.29 1399.37,1030 1260,1030 1176.18,946.18 1176.18,936.59 1175.18,935.59 1175.18,892.67 1176.18,891.67 1176.18,879.88 1203.08,852.97 1205.19,852.97 1236.11,822.05 1236.11,819.9 1233,816.79 v1(1233,813) 1231.13,811.13 1231.13,783.87
SDA1: R35.2 U3.8 U6.3 U7.6 | length 834.7
  Top Layer w10: U6.3@1246.19,625.91 1247.1,626.82 1247.1,643.1 1255.13,651.13 1255.13,655.13 1257,657 1257,727 1300.32,770.32 ; U7.6@1300.32,781.77 1300.32,770.32 ; U3.8@1805.36,684.02 1775.39,684.02 1764.96,673.59 1764.96,671.33 1749.14,655.52 1690.86,655.52 1670.92,675.45 1670.92,695.45 1647.72,718.66 1647.72,741.4 1604.57,784.54 1479.54,784.54 1467.96,772.96 1433.53,772.96 R35.2@1430,769.42 1428.95,769.42 1402.04,742.52 1289.99,742.52 1300.32,752.84 1300.32,770.32
SWDCLK: J7.4 U6.18 | length 421.2
  Top Layer w10: v1(1143.48,390.66) 1143.48,390.79 1167.43,414.75 U6.18@1167.43,440.87
  Bottom Layer w10: J7.4@880.72,189 880.72,201.21 895.2,215.69 895.2,228.78 936.95,270.53 1009.54,270.53 1113.95,374.94 1123.97,374.94 1139.69,390.66 v1(1143.48,390.66)
SWDIO: J7.3 U6.19 | length 354.2
  Top Layer w10: v1(1182.26,391.39) 1182.26,395.18 1187.12,400.04 U6.19@1187.12,440.87
  Bottom Layer w10: J7.3@979.15,189 979.15,196.84 1005.32,223.01 1005.32,240.32 1120.48,355.48 1144.27,355.48 1150.52,361.74 1154.38,361.74 1182.26,389.62 v1(1182.26,391.39)
TXD: P2.3 U6.2 | length 894.1
  Top Layer w10: U6.2@1265.88,625.91 1266.79,626.82 1266.79,640.16 1268.76,642.14 1268.76,642.24 1273,646.48 1273,654.56 1284,665.56 v1(1284,669.35)
  Layer 2 w15: P2.3@870,1290 951.44,1208.56 951.44,1097.59 1019.61,1029.43 1019.61,921.69 1057.3,884 1135.83,884 1182.5,837.33 1182.5,792.08 1250,724.58 1250,694.74 1273.68,671.07 1282.28,671.07 v1(1284,669.35)
V_in_from_LiPo: R9.2 R17.1 SW1.1 | length 1252.1
  Top Layer w10: v1(2034.56,875.53) 2033.53,875.53 2019.42,861.42 2019.42,828.95 2031.32,817.04 2032.38,817.04 2051.32,798.1 2051.32,756.2 2051.46,756.06 2051.46,739.41 2057.32,733.55 R17.1@2084.71,733.55
  Bottom Layer w20: SW1.1@1251.26,1270 1337.29,1183.97 1417.64,1183.97 1492.06,1109.55 1492.06,1005.42 1597.47,900 1718.95,900 1769.47,950.53 1907.92,950.53 1947.61,910.84 1947.61,893.72 1959.33,882 2024.3,882 2030.77,875.53 v1(2034.56,875.53)
VBAT: C7.2 C8.2 J2.1 pad.3@1828,587 R17.2 U3.2 U3.3 U4.2 U4.3 | length 976.2
  Top Layer w15: pad.3@1828,587 1868.83,546.17 1868.83,521.68 C8.2@1878,512.51 1881.97,512.51 1899.17,529.71 1899.17,565.6 1900.77,567.21 1900.77,602.48 1917.37,619.08 1940,619.08 1940.54,618.54 1998.06,618.54 2010.85,631.33 2010.85,641.42 2020.37,650.94 2010.85,660.46 2010.85,669.19 2010.8,669.24 2010.8,680.77 2000.67,690.9 ; J2.1@1862.97,847.97 J2.1@1885,870 1915,840 1915,805 1937.75,782.25 1937.75,759.82 1957.56,740 1962.44,740 1968.88,733.55 1992.71,733.55 R17.2@2023.56,733.55 2015.1,725.1 2015.1,705.33 2000.67,690.9 ; U3.2@1882.86,703.76 U3.3@1882.86,723.34 ; U3.2@1890.67,706.19 1894.02,702.84 1908.39,702.84 1909.14,702.09 1989.47,702.09 2000.67,690.9 ; 1992.71,728.85 2017.88,728.85 R17.2@2023.56,734.53 ; U4.3@2011.18,566.18 2021.03,566.18 ; C7.2@2022.22,650 2022.22,567.38 2021.03,566.18 ; U4.2@2030.87,566.18 2021.03,566.18
  other v1: 1960,740
VDD: L4.2 R1.2 R8.2 R33.2 | length 1321.2
  Top Layer w8: L4.2@1131.5,940 1131.5,966.75 1133,968.25
  Top Layer w20: 1133,968.25 1133,1001.92 1140,1008.92 v1(1140,1010) ; R33.2@1462.98,963.55 1462.98,1031.7 1501.28,1070 v1(1560,1070) ; R8.2@1564.42,1030 1560.77,1033.66 1560.77,1069.23 v1(1560,1070) ; R1.2@1776.22,1307.96 1774.17,1310 1631.5,1310 1560,1238.5 v1(1560,1070)
  Layer 2 w20: v1(1140,1010) 1175.17,1045.17 1183.84,1045.17 1218.24,1079.57 1218.24,1135.24 1263.08,1180.08 1519.92,1180.08 1560,1140 v1(1560,1070)
VDDA: C34.1 C35.1 L4.1 U6.5 | length 382.3
  Top Layer w8: 1068.5,906 L4.1@1068.5,940
  Top Layer w15: 1068.5,906 1068.5,857.66 1078.95,847.21 1078.95,846.39 1093.89,831.45 1094.71,831.45 1124.93,801.23 1124.93,785.07 C35.1@1160,750 ; C35.1@1162.34,747.66 1183.5,726.5 1194.22,726.5 1211.5,709.22 1211.5,708.82 C34.1@1220,700.32 1218.6,698.92 1218.6,679.06 1210,670.46 v1@1210,668.94 ; U6.5@1206.81,630.23 1206.81,661.19 1212.13,666.51 v1(1212.13,668.94)
Vin: J1.A4-B9 J1.B4-A9 NT1.1 pad.3@2237,695 | length 575.4
  Top Layer w20: pad.3@2237,695 2240.71,691.29 2271.13,691.29 2273.44,688.98 ; J1.A4-B9@2317.36,595.59 2315.55,597.4 2289.97,597.4 2281.71,605.66 ; J1.B4-A9@2317.36,784.57 2306.54,784.57 2302.85,780.88 2288.1,780.88 2273.44,766.23 2273.44,688.98 ; NT1.1@2340,445 2280,445 2227.22,497.78 2227.22,578.62 2254.26,605.66 2273.44,605.66 2281.71,605.66 ; 2273.44,688.98 2273.44,613.93 2281.71,605.66
Vout_to_LDO: C3.2 R2.2 R4.1 U2.13 U2.15 U2.16 | length 657.7
  Top Layer w10: U2.16@1885.67,1216.38 U2.16@1886.13,1215.92 ; 1905.78,1215.92 1909.39,1212.31 ; U2.15@1928.98,1172.36 C3.2@2007.38,1172.36 ; U2.13@1929.69,1121.18 1930.15,1120.72 1953.71,1120.72 1958.82,1115.62 1996.27,1115.62 2007.23,1126.58 2007.23,1172.51 2019.7,1184.98 C3.2@2020,1184.98
  Top Layer w15: U2.16@1886.13,1215.92 1905.78,1215.92
  Top Layer w20: 1912.69,1212.31 1919.5,1219.11 1949.37,1219.11 1982.53,1185.95 2019.02,1185.95 C3.2@2020,1184.98 2025.18,1179.8 2086.85,1179.8 ; R4.1@2095,1060.58 2096.05,1060.58 2102.96,1067.48 2102.96,1074.75 2107.4,1079.2 2107.4,1159.25 2086.85,1179.8 ; R2.2@2104.42,1250 2104.42,1194.92 2097.31,1187.8 2094.86,1187.8 2086.85,1179.8
VREFP: C20.1 C21.1 U5.9 | length 391.1
  Top Layer w8: U5.9@488.21,431.21 488.21,397.63 456.91,366.33 456.91,354.91 457.91,353.91 457.91,320.04 452.06,314.18 450.64,314.18 437.49,301.02 437.49,214.82 470,182.31 C20.1@470,181.39 481.28,192.66 530.86,192.66 556.03,167.49 C21.1@560,167.49
pads on no net: E1.2 J1. J1.1 J1.2 J1.3 J1.4 J1.A6 J1.A7 J1.A8 J1.B6 J1.B7 J1.B8 J4. SW1.3 SW1.4 SW1.5 U2.4 U2.5 U2.6 U2.9 U2.10 U7.2 U7.3 U7.13 U7.15 U7.16

## Polygon pours and split planes (outlines as drawn)
DGND on Top Layer "DGND_L01_P001" (solid, pour order 1): 1501.88,30 865.08,30 865.08,1380 2360,1380 2360,30
"Power Ground" on Top Layer "POWER_GROUND_L01_P014" (solid, pour order 14): 1563,1362 1565,1360 2147,1360 2147,1062 2012,927 1516,927 1516,1362
AGND on Top Layer "AGND_L01_P013" (solid, pour order 13): 810,1140 810,40 180,40 180,60.03 ccw(c80,60.03) 150.71,130.74 126.16,155.29 ccw(c55.45,84.58) 55.45,184.58 35.42,184.58 35.42,1098.94 cw(c51.06,1098.94) 40,1110 40.71,1110.71 cw(c111.42,1040) 111.42,1140 180,1140
GND on Top Layer "GND_L01_P012" (solid, pour order 12): 2430,940 2430,500 2390,460 2300,460 2140,620 2140,940
DVDD on Layer 2 "DVDD_L03_P006" (solid, pour order 6): 1905.6,1334.88 1905.6,1329.88 2390.6,844.88 2390.6,159.88 900.6,159.88 885.6,174.88 885.6,1294.88 925.6,1334.88 945.6,1334.88 925.6,1334.88 945.6,1334.88
AVDD on Layer 2 "AVDD_L03_P003" (solid, pour order 3): 846.73,1067.73 846.73,207.73 656.73,17.73 57.73,17.73 57.73,1067.73
DGND on Bottom Layer "DGND_L04_P011" (solid, pour order 11): 783.33,1380 783.33,0 2453.33,0 ccw(c2453.33,100) 2553.33,100 2553.33,1283.34 ccw(c2456.67,1283.34) 2456.67,1380 783.29,1380
GND on Layer 1 "GND_L02_P008" (solid, pour order 8): 1.17,92 ccw(c91.72,92) 91.72,1.45 91.72,2 2465.07,2 ccw(c2465.07,93.73) 2556.8,93.73 2556.8,1280.27 ccw(c2455.04,1280.27) 2455.04,1382.02 92.29,1382.02 92.27,1382 ccw(c92.27,1291.45) 1.72,1291.45

## Keep-outs
Keep-Out Layer:
  rectangle: 1434.09,0 1690,206.15

## Silkscreen, mask and mechanical layers (free items; w line width, h text height)
Top Overlay:
  drawing of 85 lines, arcs and shapes, not listed
  text "R" at 792,251 h30 r90
  text "SWDCLK" at 895,249 h30 r90
  text "SWDIO" at 997.95,242.06 h30 r90
  text "GND" at 1087.13,232.56 h30 r90
  text "3V3" at 1189,66 h30 r90
Bottom Overlay:
  drawing of 47 lines, arcs and shapes, not listed
Mechanical 1:
  lines w5: -0.55,90 ccw(c90,90) 90,-0.55 ; 0,90 0,1289.45 cw(c90.55,1289.45) 90.55,1380 2453.32,1380.02 cw(c2453.32,1278.26) 2555.08,1278.26 2555.08,91.72 cw(c2463.35,91.72) 2463.35,0 90,0

## Text inside footprints (layer, text, board x,y; h text height)
U6: Top 3D Body "*" at 1285.41,626.6 h50 r270